# Altium PCB AirSensor.PcbDoc
Units mm, origin at the board's own origin, x right, y up, seen from the top; angles counter-clockwise.
Board outline 20 x 47.75 mm, 2 copper layers (Top Layer, Bottom Layer); 8 components, 18 nets, 58 pads, 119 vias.
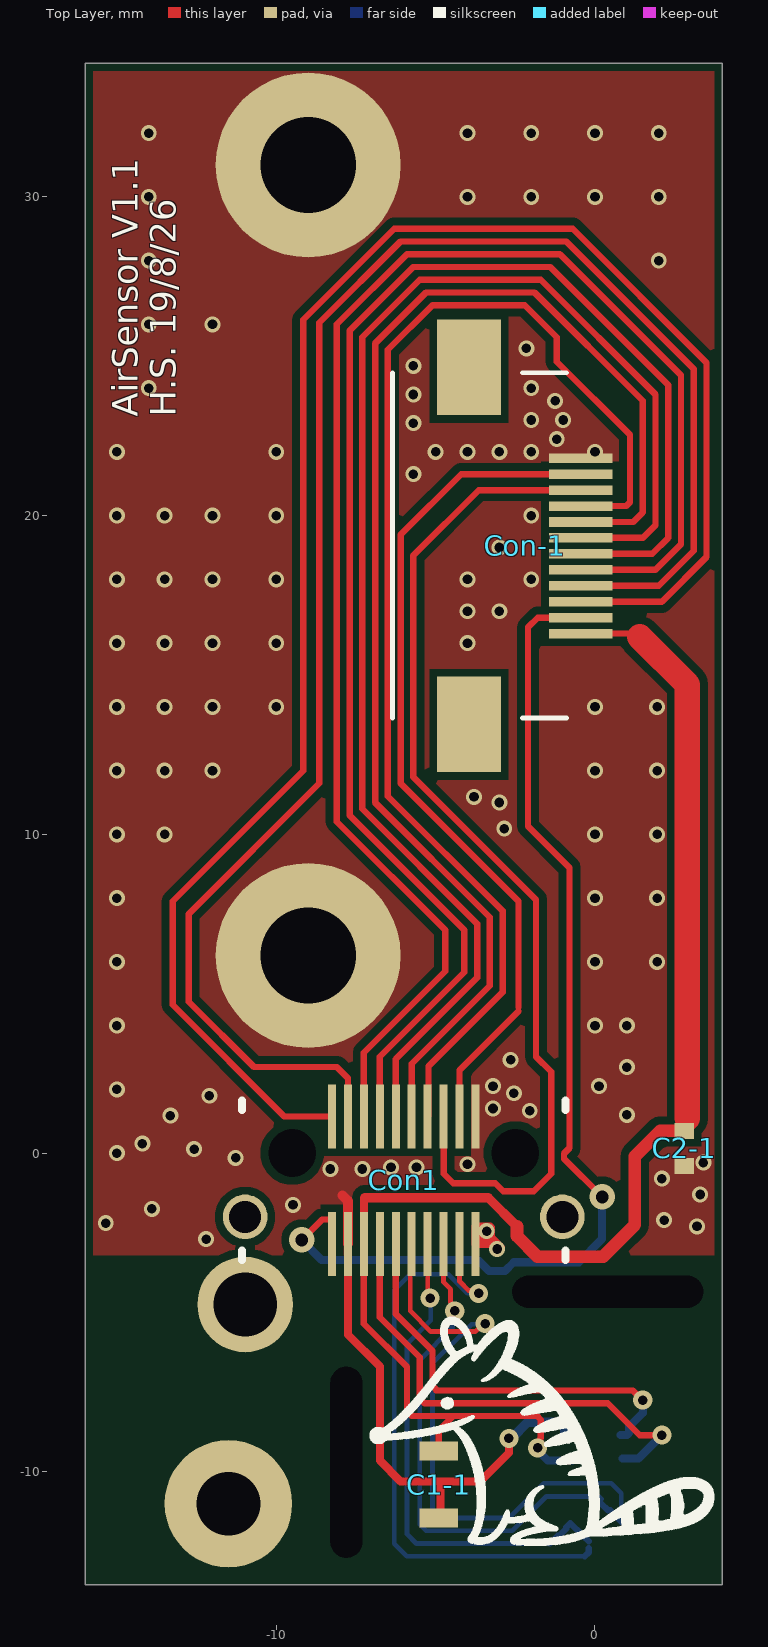
[diagram p0: Top Layer view]
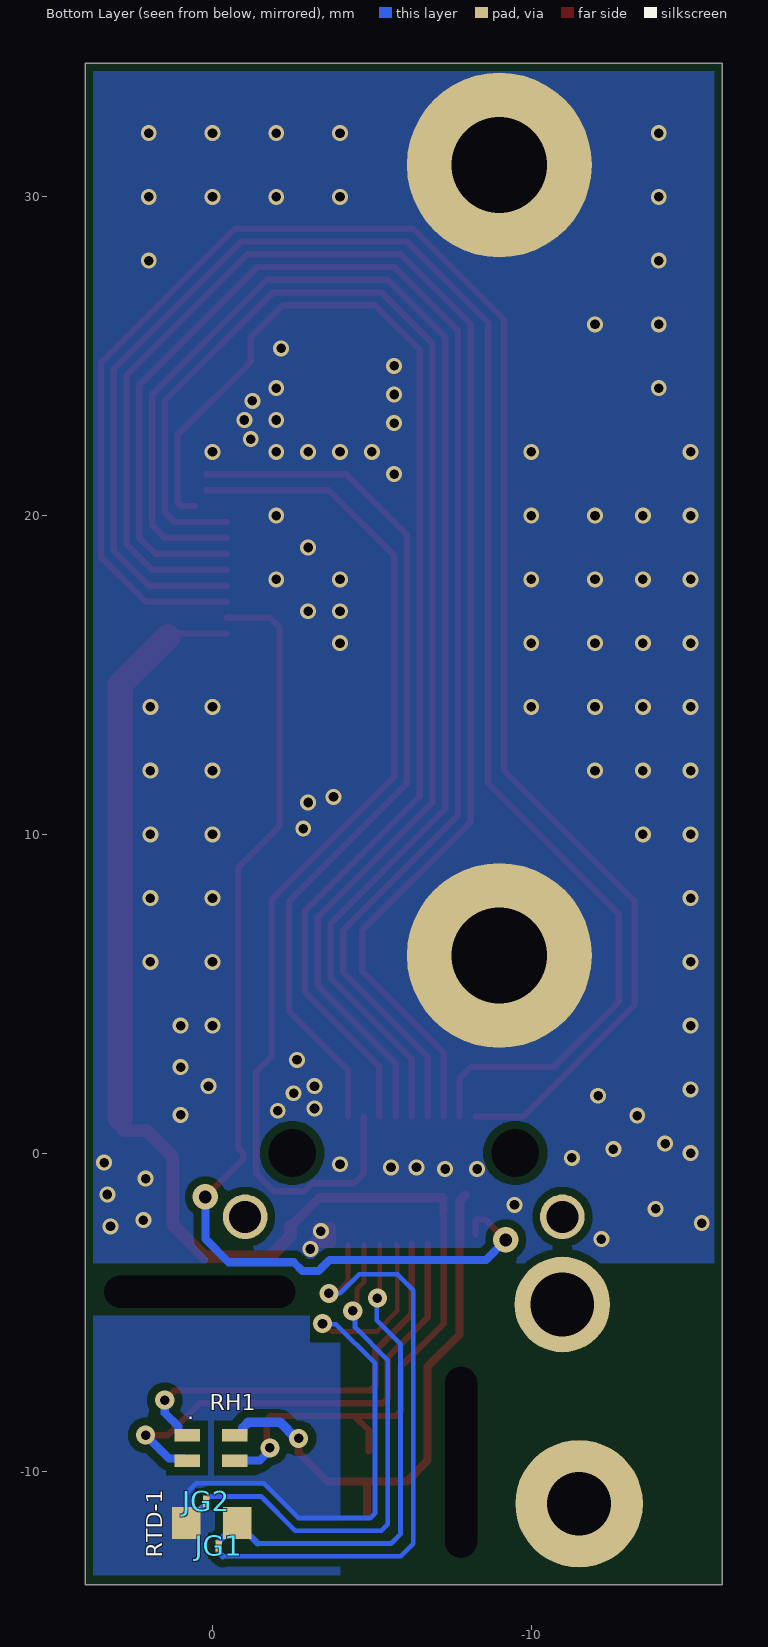
[diagram p1: Bottom Layer view, seen from below]

## Layer stack, top to bottom
Top Solder: solder mask 0.0102, Solder Resist, Dk 3.5
Top Layer: signal copper 0.0356
Dielectric 1: dielectric 0.32, FR-4, Dk 4.8
Bottom Layer: signal copper 0.0356
Bottom Solder: solder mask 0.0102, Solder Resist, Dk 3.5

## Board outline
-16,-13.55 -16,34.2 4,34.2 4,-13.55

## Design rules (kind name [scope] priority, off if disabled: settings)
BoardOutlineClearance [All] p1: gap=0.254 ignorepadtopadclearanceinfootprint=FALSE except(0: Arc-SplitContinuation Track-SplitContinuation SMDPad-SplitContinuation THPad-SplitContinuation Via-SplitContinuation Fill-SplitContinuation Poly-SplitContinuation Region-SplitContinuation Text-SplitContinuation)
Clearance [All] p1: gap=0.25 ignorepadtopadclearanceinfootprint=TRUE except(0: Arc-Text Track-Text SMDPad-Text THPad-Text Via-Text Fill-Text Poly-Text Region-Text Text-Text Text-Hole; 0.2: Arc-Arc Arc-Track Arc-SMDPad Track-Track Track-SMDPad SMDPad-SMDPad THPad-THPad)
HoleSize [All] p1: absolutevalues=TRUE maxlimit=99 minlimit=0.025 maxpercent=80.000 minpercent=20.000
MinimumSolderMaskSliver [All] p1: minsoldermaskwidth=0
PlaneConnect [All] p1: planeconnectstyle=Direct reliefexpansion=0.508 reliefentries=4 reliefconductorwidth=0.254 reliefairgap=0.254
PolygonConnect [All] p1: connectstyle=Direct reliefconductorwidth=0.5 reliefentries=4 polygonreliefangle="90 Angle" airgapwidth=0.254
RoutingVias [All] p1: holewidth=0.45 width=0.8 viastyle="Through Hole" minholewidth=0.3 minwidth=0.5 maxholewidth=2 maxwidth=10
SolderMaskExpansion [All] p1: expansion=0.102 istentingtop=FALSE
Width [All] p1: maxlimit=50 minlimit=0.15 preferedwidth=0.2 minimp=50.000000 maximp=50.000000 favimp=50.000000
27 further rules are at their usual default settings.

## Classes and differential pairs
component class AirSensor: C1-1 C2-1 Con1 Con-1 RH1 RTD-1

## Components (designator, comment, footprint, x,y, rotation, side; value= is the part's Value field where it differs from the comment)
C1-1 "0.22uF Non Magnetic" 0805_Compact -4.9,-11.45 r90 top
C2-1 "100pF Non Magnetic" 0402 2.8,0.7 r270 top
Con1 "Connector_LSHM_110" Connector_LSHM_110 -6,-0.85 r0 top
Con-1 "ConnectorMoled_12FlexRA" Connector_Molex_12Flex_RA -0.45,19.05 r270 top locked
JG1 "Jumper_Ground_Tiny" GndConnectorTiny -0.2,-12.25 r0 bottom
JG2 "Jumper_Ground_Tiny" GndConnectorTiny 0.2,-11 r180 bottom
RH1 "SHT40I" 4-WDFN 0.8,-8.85 r180 bottom
RTD-1 "RTD_SMD" 0603 0.826,-11.608 r180 bottom

## Footprints (in the part's own frame and the unit in brackets; to place one, negate y for a bottom-side part, rotate by r counter-clockwise, add the part's x,y. Pads: shape width x height; smd on the part's side, far side on the other; paste and mask are expansions set on the pad)
4-WDFN [mm]
  rect 0.8x0.4 smd mask+0.15: 1(0,0) 2(0,-0.8) 3(1.5,-0.8) 4(1.5,0)
0402 [mm]
  rect 0.5x0.6 smd mask+0.05: 1(0,0) 2(1.1,0)
0603 [mm]
  rect 0.9x1 smd mask+0.05: 1(0,0) 2(1.6,0)
0805_Compact [mm]
  rect 0.6x1.2 smd: 1(2.1,0) 2(0,0)
Connector_LSHM_110 [mm]
  round 1.4 hole 1 mask+0.15: 0(-4.975,-1.15) 0(4.975,-1.15)
  round 0 hole 1.5 unplated mask+0.05: 0(-3.5,0.85) 0(3.5,0.85)
  rect 0.25x2 smd mask+0.15: 1(-2.25,2) 2(-2.25,-2) 3(-1.75,2) 4(-1.75,-2) 5(-1.25,2) 6(-1.25,-2) 7(-0.75,2) 8(-0.75,-2) 9(-0.25,2) 10(-0.25,-2) 11(0.25,2) 12(0.25,-2) 13(0.75,2) 14(0.75,-2) 15(1.25,2) 16(1.25,-2) 17(1.75,2) 18(1.75,-2) 19(2.25,2) 20(2.25,-2)
  silkscreen extent -5.07,-2.5 5.07,2.5
Connector_Molex_12Flex_RA [mm]
  rect 3x2 smd paste+0: 0(-5.6,-3.5) 0(5.6,-3.5)
  rect 0.3x2 smd paste+0: 1(-2.75,0) 2(-2.25,0) 3(-1.75,0) 4(-1.25,0) 5(-0.75,0) 6(-0.25,0) 7(0.25,0) 8(0.75,0) 9(1.25,0) 10(1.75,0) 11(2.25,0) 12(2.75,0)
  silkscreen extent -5.43,-5.9 5.4,-0.45
GndConnectorTiny [mm]
  rect 0.2x0.2 smd paste-100 mask+0.1: 1(0,0.15)
  rect 0.2x0.2 smd paste-10 mask+0.1: 2(0,0)

## Part data
C1-1 C2-1: library part Capacitor1
  C1-1: Digikey P/N=1608-1296-1-ND
  C2-1: Digikey P/N=1608-1288-1-ND
Con1: Digikey P/N=SAM15998CT-ND
Con-1: Digikey P/N=900-5051101297CT-ND
RH1: Digikey P/N=1649-SHT40I-HD1F-R2CT-ND
RTD-1: Digikey P/N=2952-P1K0.0603.3FC.B-ND

## Free pads (board coordinates)
  round 4 hole 2 paste+0: 0(-11.5,-11)
  round 3 hole 2 paste+0: 0(-10.975,-4.75)
  round 5.8 hole 3 paste+0: 0(-9,6.2) 1(-9,31)
  round 0 hole 1 slot 6 at 90 deg unplated paste+0: 2(-7.8,-9.7)
  round 0 hole 1 slot 6 at 0 deg unplated paste+0: 2(0.4,-4.35)

## Via types
v1: diameter 0.5, hole 0.3, Top Layer to Bottom Layer, tented both sides, 109 vias
v2: diameter 0.6, hole 0.3, Top Layer to Bottom Layer, tented both sides, 8 vias
v3: diameter 0.8, hole 0.4, Top Layer to Bottom Layer, tented both sides, 2 vias

## Nets (pads, with @x,y where several pads share a name; then routed paths per layer and width w, separated by ;. In a path a pad name is that pad's centre, name@x,y a point inside that pad or via, vN(x,y) a via of type N, cw(c..) or ccw(c..) an arc to the next point about the centre after c; other vN are vias at no path point)
5V: C1-1.1 C2-1.1 Con1.6 Con-1.12 RH1.3 | length 46.5
  Top Layer w0.2: Con1.6@-7.225,-1.95 -7.25,-1.975 Con1.6 -7.25,-5.35 -5.9,-6.7 -5.9,-8.1 -5.75,-8.25 -4.45,-8.25 ; C1-1.1 -4.9,-8.7 -4.45,-8.25 ; v2(-1.8,-9.25) -1.723,-9.173 -1.723,-8.956 -1.7,-8.933 -1.7,-8.367 -1.817,-8.25 -4.45,-8.25 ; Con-1.12 1.3,16.3 1.4,16.2
  Top Layer w0.254: -7.25,-1.833 -7.25,-1.4
  Top Layer w0.3: -7.225,-1.4 -3.35,-1.4 -2.45,-2.3
  Top Layer w0.4: -2.45,-2.3 -2.45,-2.6 -1.8,-3.25 0.25,-3.25 1.25,-2.25 1.25,-0.1 2.05,0.7 2.625,0.7 C2-1.1
  Top Layer w0.8: 1.4,16.2 2.9,14.7 2.9,1.1
  Bottom Layer w0.254: v2(-1.8,-9.25) -1.8,-9.331 -1.481,-9.65 RH1.3
BOut1_Con: Con1.1 Con-1.10 | length 55.8
  Top Layer w0.2: Con1.1 -9.75,1.15 -13.25,4.65 -13.25,7.9 -9.15,12 -9.15,26.15 -6.3,29 -0.7,29 3.5,24.8 3.5,18.7 2.1,17.3 Con-1.10
BOut2_Con: Con1.2 Con-1.11 | length 34
  Top Layer w0.2: v3(-9.2,-2.725) -8.558,-2.083 -8.275,-2.083 -8.25,-2.108 Con1.2@-8.25,-2.567 ; Con-1.11 -1.8,16.8 -2.1,16.5 -2.1,10.25 -0.8,8.95 -0.8,0.16 -0.972,-0.012 -0.972,-0.178 v3(0.225,-1.375)
  Bottom Layer w0.254: v3(-9.2,-2.725) -8.575,-3.35 -3.675,-3.35 -3.325,-3.7 -2.825,-3.7 -2.55,-3.425 -0.5,-3.425 0.225,-2.7 v3(0.225,-1.375)
GND: C1-1.2 C2-1.2 Con1.4 Con1.19 Con1.20 Con-1.1 pad.0@-9,6.2 pad.1 RH1.4 | length 20.2
  Top Layer w0.254: Con1.4 -7.75,-5.7 -6.75,-6.7 -6.75,-9.65 -6.1,-10.3 -4.85,-10.3 ; C1-1.2@-4.85,-11.4 -4.85,-10.3 ; Con1.20 -3.122,-2.85 -3.013,-2.959 -2.946,-2.959 -3.26,-2.645 -3.26,-2.34 -3.3,-2.3 -3.748,-2.3 Con1.20@-3.748,-2.798 ; v2@-2.794,-8.95 v2(-2.7,-8.95) ; v2@-2.703,-8.953 -2.703,-9.403 -3.6,-10.3 -4.85,-10.3
  Top Layer w0.3: -7.925,-1.325 -7.75,-1.5 Con1.4
  Bottom Layer w0.3: v2(-2.7,-8.95) -2.619,-8.95 -2.111,-8.442 -1.126,-8.442 -0.95,-8.618 -0.95,-8.8 -0.9,-8.85 RH1.4
  other v1: -3.071,-3.009 -12.2,-2.7 -3.4,-2.45 3.2,-2.3 -15.35,-2.2 2.169,-2.104 -13.9,-1.75 -9.475,-1.625 3.3,-1.3 2.1,-0.8 -8.3,-0.5 -7.3,-0.5 -6.4,-0.45 -5.6,-0.45 -4,-0.35 3.4,-0.3 -11.275,-0.15 -15,0 -12.575,0.125 -14.2,0.3 -13.325,1.175 1,1.2 -2.046,1.328 -3.2,1.4 -12.1,1.8 -2.546,1.878 -15,2 -3.2,2.1 0.125,2.1 1,2.7 -2.65,2.925 -15,4 0,4 1,4 -15,6 0,6 1.95,6 -15,8 0,8 1.95,8 -15,10 -13.5,10 0,10 1.95,10 -2.846,10.178 -3,11 -3.796,11.178 -15,12 -13.5,12 -12,12 0,12 1.95,12 -15,14 -13.5,14 -12,14 -10,14 0,14 1.95,14 -15,16 -13.5,16 -12,16 -10,16 -4,16 -4,17 -3,17 -15,18 -13.5,18 -12,18 -10,18 -4,18 -2,18 -3,19 -15,20 -13.5,20 -12,20 -10,20 -2,20 -5.7,21.3 -15,22 -10,22 -5,22 -4,22 -3,22 -2,22 0,22 -1.2,22.4 -5.7,22.9 -2,23 -1,23 -1.25,23.6 -5.7,23.8 -14,24 -2,24 -5.7,24.7 -2.15,25.25 -14,26 -12,26 -14,28 2,28 -14,30 -4,30 -2,30 0,30 2,30 -14,32 -4,32 -2,32 0,32 2,32
GND_Hall_Con: Con1.5 Con-1.8 | length 49.4
  Top Layer w0.2: Con1.5 -7.25,3.15 -4.7,5.7 -4.7,7 -8.1,10.4 -8.1,26 -5.9,28.2 -1.1,28.2 2.7,24.4 2.7,19.1 1.9,18.3 Con-1.8
HallOut1_Con: Con1.7 Con-1.7 | length 47.4
  Top Layer w0.2: Con1.7 -6.75,3.025 -4.1,5.675 -4.1,7 -7.7,10.6 -7.7,25.8 -5.7,27.8 -1.4,27.8 2.3,24.1 2.3,19.3 1.8,18.8 Con-1.7
RH: Con1.10 RH1.1 | length 13.2
  Top Layer w0.2: Con1.10 -6.25,-5.05 -5.1,-6.2 -5.1,-7.3 -4.967,-7.433 ; -4.983,-7.45 1.183,-7.45 1.483,-7.75 v2(1.5,-7.75)
  Bottom Layer w0.254: RH1.1 1,-8.85 1.073,-8.777 1.073,-8.577 1.5,-8.15 v2(1.5,-7.75)
RTD_Air_D1: Con1.12 JG2.2 RTD-1.1 | length 20.1
  Top Layer w0.15: Con1.12 -5.799,-2.899 -5.799,-4.951 -5.15,-5.6 -3.763,-5.6 -3.513,-5.35 v2(-3.45,-5.35)
  Bottom Layer w0.15: v2(-3.45,-5.35) -3.471,-5.371 -3.871,-5.371 -5.1,-6.6 -5.1,-11.3 -4.95,-11.45 -2.7,-11.45 -1.608,-10.358 0.508,-10.358 0.826,-10.676 0.826,-11.558 RTD-1.1
  Bottom Layer w0.2: JG2.2 0.408,-11.208 0.476,-11.208 RTD-1.1@0.826,-11.558
RTD_Air_D2: Con1.14 JG1.2 RTD-1.2 | length 15.7
  Top Layer w0.15: Con1.14 -5.25,-4.472 v2(-5.173,-4.549)
  Bottom Layer w0.15: v2(-5.173,-4.549) -5.15,-4.572 -5.15,-5.25 -5.9,-6 -5.9,-11.95 -5.6,-12.25 -1.416,-12.25
  Bottom Layer w0.2: -1.416,-12.25 -1.174,-12.008 -1.124,-12.008 -0.9,-11.784 -0.9,-11.734 RTD-1.2 RTD-1.2@-0.424,-11.958 ; RTD-1.2@-0.374,-12.008 JG1.2@-0.2,-12.182
RTD_Air_S1: Con1.16 JG2.1 | length 15.7
  Top Layer w0.15: Con1.16 -4.75,-4.05 -4.53,-4.27 -4.53,-4.698 -4.4,-4.828 v2(-4.4,-4.95)
  Bottom Layer w0.15: v2(-4.4,-4.95) -4.471,-5.021 -4.471,-5.471 -5.5,-6.5 -5.5,-11.65 -5.3,-11.85 -2.6,-11.85 -1.521,-10.771 0.121,-10.771 JG2.1
RTD_Air_S2: Con1.18 JG1.1 | length 19.4
  Top Layer w0.15: Con1.18 -4.25,-4.028 -3.964,-4.314 -3.736,-4.314 v2(-3.65,-4.4)
  Bottom Layer w0.15: v2(-3.65,-4.4) -4,-4.4 -4.6,-3.8 -5.8,-3.8 -6.3,-4.3 -6.3,-12.25 -5.9,-12.65 -0.317,-12.65
  Bottom Layer w0.2: -0.317,-12.65 -0.2,-12.533 JG1.1
RTD_D1_Con: Con1.17 Con-1.2 | length 27.5
  Top Layer w0.2: Con1.17 -4.25,2.6 -2.4,4.45 ; -2.4,4.567 -2.4,7.9 -6.1,11.6 -6.1,19.4 -4.2,21.3 Con-1.2 Con-1.2@0.2,21.3
RTD_D2_Con: Con1.11 Con-1.5 | length 42.8
  Top Layer w0.2: Con1.11 -5.75,2.8 -3.3,5.25 -3.3,7.4 -6.9,11 -6.9,25.4 -5.3,27 -1.9,27 1.5,23.6 1.5,20.1 1.2,19.8 Con-1.5
RTD_S1_Con: Con1.15 Con-1.3 | length 33.6
  Top Layer w0.2: Con1.15 -4.75,-0.65 -4.45,-0.95 -3.125,-0.95 -2.875,-1.2 -1.925,-1.2 -1.375,-0.65 -1.375,2.55 -1.85,3.025 -1.85,7.95 -5.7,11.8 -5.7,18.75 -3.65,20.8 Con-1.3 Con-1.3@0.2,20.8
RTD_S2_Con: Con1.13 Con-1.4 | length 39.5
  Top Layer w0.2: Con1.13 -5.225,1.175 -5.225,2.725 -2.9,5.05 -2.9,7.6 -6.5,11.2 -6.5,25.2 -5.1,26.6 -2.2,26.6 -1.2,25.6 -1.2,24.833 1.1,22.533 1.1,20.417 0.983,20.3 0.55,20.3
T_RH: Con1.8 RH1.2 | length 15
  Top Layer w0.2: Con1.8 -6.75,-5.15 -5.5,-6.4 -5.5,-7.7 -5.35,-7.85 0.4,-7.85 1.4,-8.85 v2(2.1,-8.85)
  Bottom Layer w0.254: RH1.2@0.865,-9.585 1.365,-9.585 v2(2.1,-8.85)
VCC_FluxGate_Con: Con1.3 Con-1.9 | length 54.4
  Top Layer w0.2: Con1.3 -7.75,2.35 -8.1,2.7 -10.7,2.7 -12.75,4.75 -12.75,7.5 -8.65,11.6 -8.65,26.05 -6.1,28.6 -0.9,28.6 3.1,24.6 3.1,18.9 2,17.8 Con-1.9
VCC_Hall_Out_Con: Con1.9 Con-1.6 | length 45
  Top Layer w0.2: Con1.9 -6.25,2.95 -3.7,5.5 -3.7,7.2 -7.3,10.8 -7.3,25.6 -5.5,27.4 -1.7,27.4 1.9,23.8 1.9,19.7 1.5,19.3 Con-1.6
pads on no net: Con1.0 Con-1.0

## Polygon pours and split planes (outlines as drawn)
no net on Bottom Solder "PLN1" (solid, pour order 2): 4,-0.9 -16,-0.9 -16,34.2 4,34.2
GND on Bottom Layer "PLN1" (solid, pour order 1): 4,-3.45 -16,-3.45 -16,34.2 4,34.2
RTD_Air_D1 on Bottom Layer "PLN1" (solid, pour order 3): 4,-5.95 -4,-5.95 -4,-13.25 4,-13.25
RTD_Air_D1 on Bottom Layer "PLN1" (solid, pour order 4): 4,-5.1 -3.05,-5.1 -3.05,-6.05 4,-6.05
GND on Top Layer "PLN1" (solid, pour order 0): 4,-3.2 -16,-3.2 -16,34.2 4,34.2

## Other copper
Top Layer:
  rectangle net GND: -3.748,-2.85 -3.28,-2.32

## Silkscreen, mask and mechanical layers (free items; w line width, h text height)
Top Overlay:
  drawing of 2 lines, arcs and shapes, not listed
  text "AirSensor V1.1 / H.S. 19/8/26" at -13.15,23.1 h0.8 r90
Mechanical 1:
  the board outline again, w0.1